# Altium PCB PCB_Z35.PcbDoc (part 2 of 3)
Units mm, origin at the board's own origin, x right, y up, seen from the top; angles counter-clockwise.
Board outline 116.46 x 196.34 mm, 2 copper layers (Top Layer, Bottom Layer), stack 1.671 mm thick; 178 components, 183 nets, 705 pads, 291 vias.
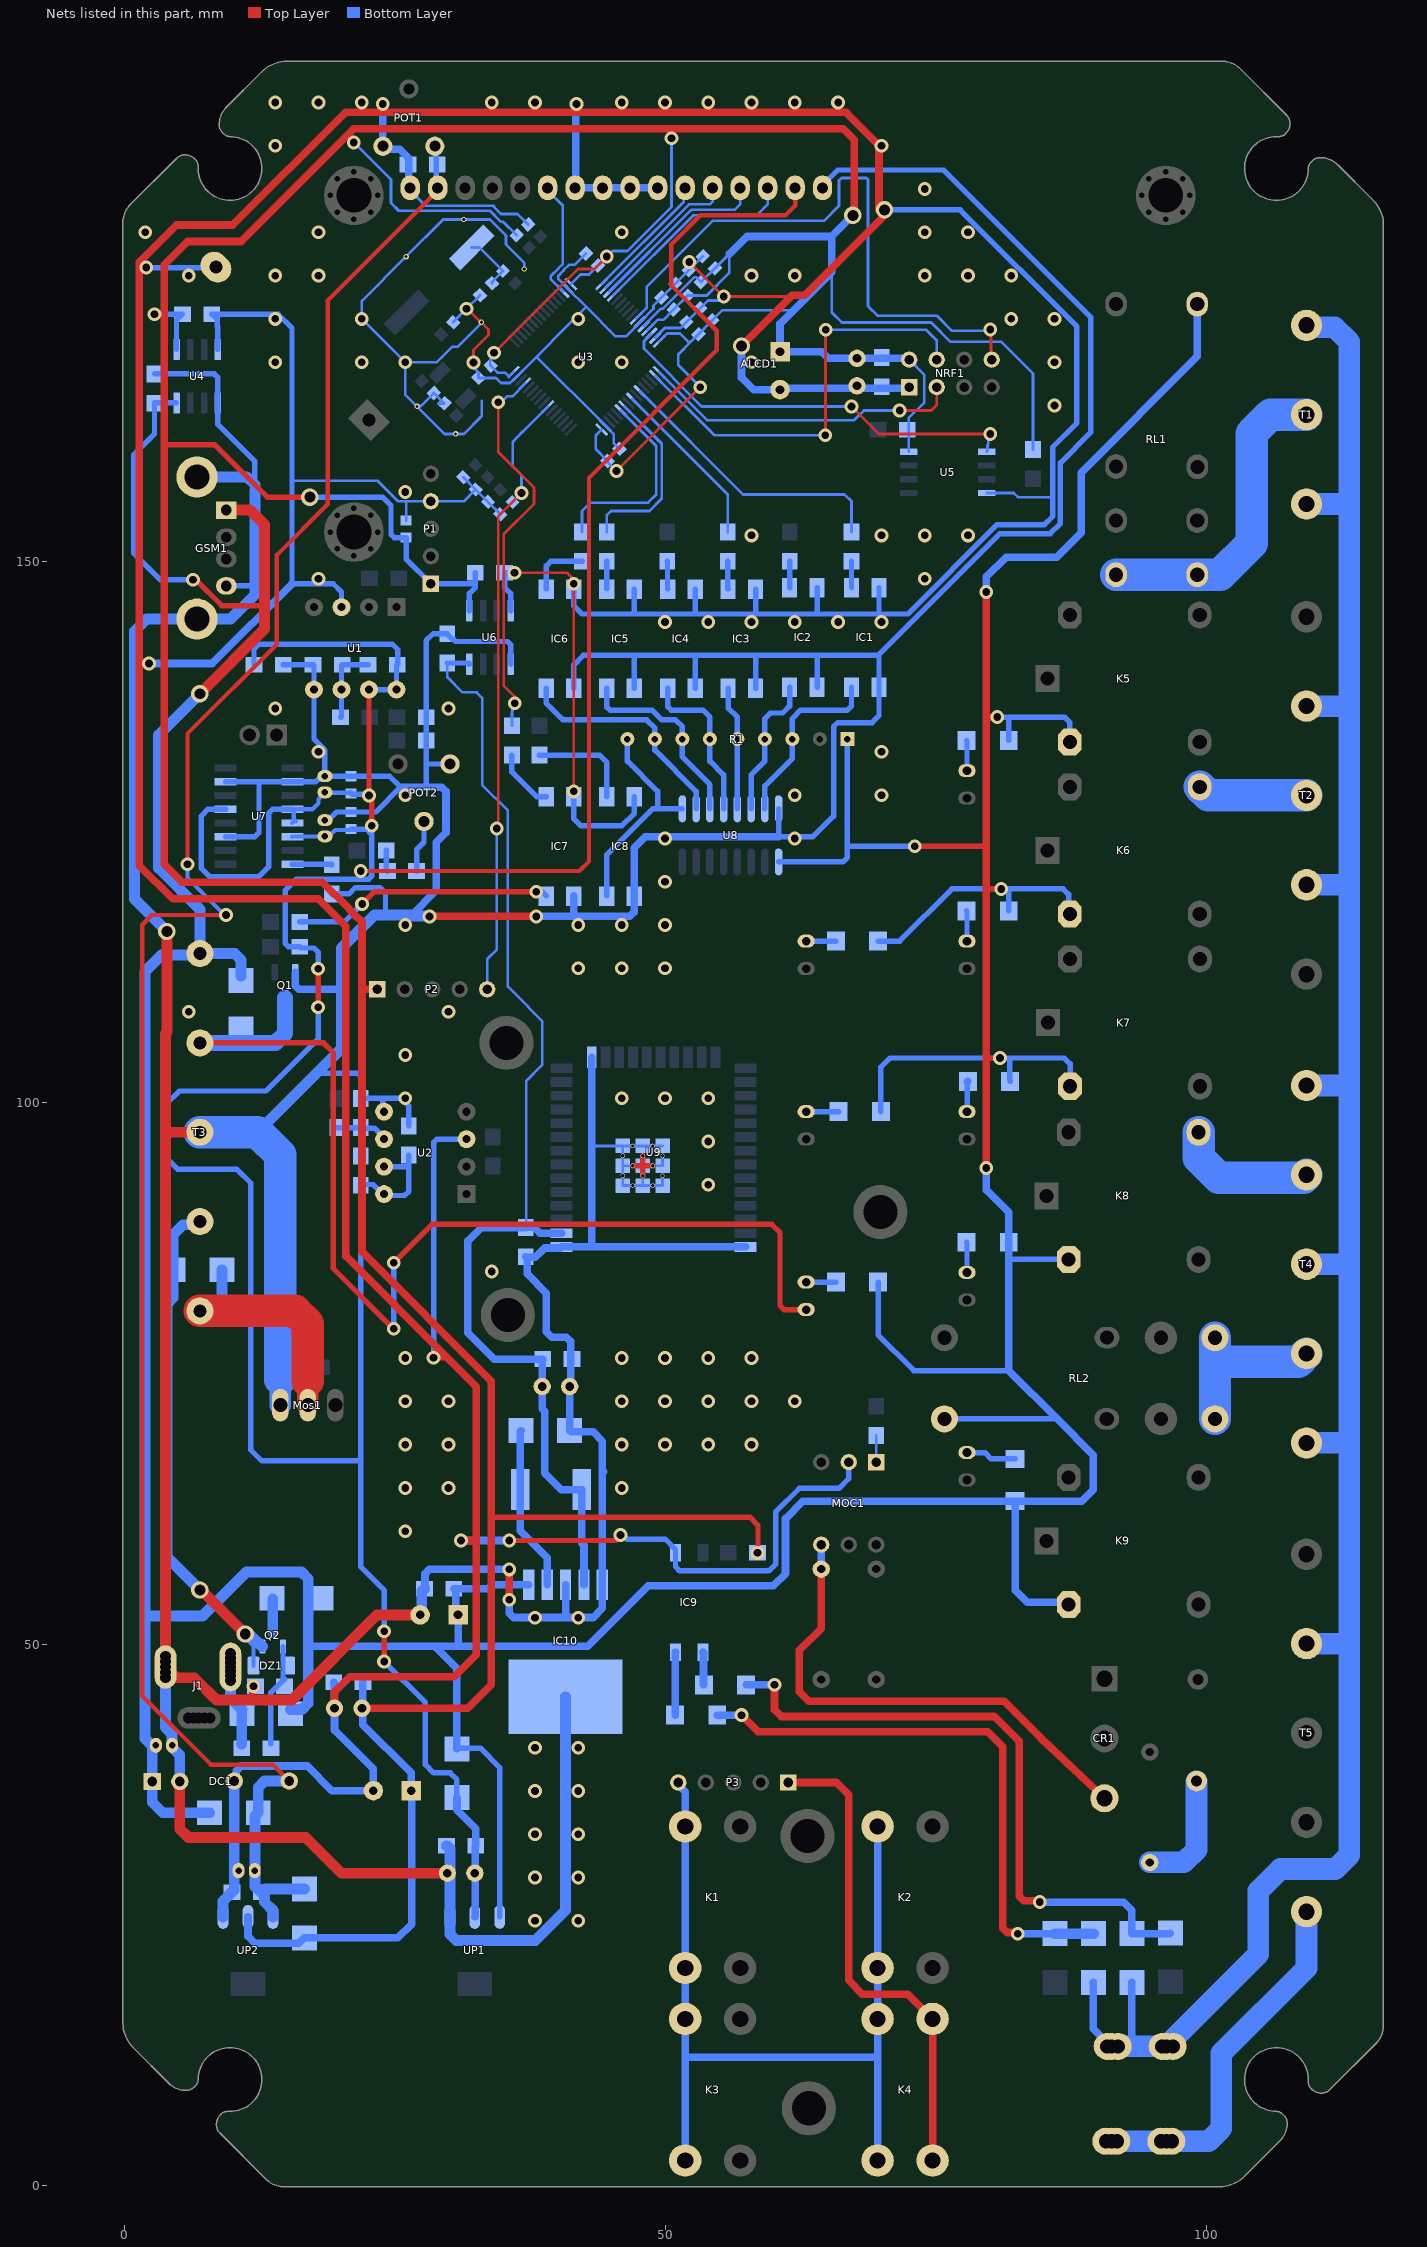
[diagram p2: the nets of this part, all layers, seen from the top]

## Via types
v1: diameter 1.27, hole 0.711, Top Layer to Bottom Layer, tented both sides, 237 vias
v2: diameter 0.5, hole 0.3, Top Layer to Bottom Layer, 40 vias
v3: diameter 1.6, hole 1, Top Layer to Bottom Layer, tented both sides, 8 vias
v4: diameter 0.5, hole 0.3, Top Layer to Bottom Layer, tented both sides, 6 vias

## Nets (pads, with @x,y where several pads share a name; then routed paths per layer and width w, separated by ;. In a path a pad name is that pad's centre, name@x,y a point inside that pad or via, vN(x,y) a via of type N, cw(c..) or ccw(c..) an arc to the next point about the centre after c; other vN are vias at no path point)
3.3v: C1.1 C2.1 C8.1 C10.1 C15.1 C16.1 C17.1 C19.1 C20.1 C21.1 C22.1 C23.1 C25.2 C26.1 C30.1 C31.1 C32.1 C47.1 D16.1 NRF1.2 P1.1 P2.1 R5.2 R7.2 R8.2 R40.1 U3.16 U3.28 U3.29 U3.32 U3.48 U3.64 U4.1 U5.8 U6.1 UP2.2 | length 554.4
  Top Layer w0.254: 20.51,189.293 21.082,188.722 v1(21.209,188.722) ; v1(34.163,169.291) 41.91,177.038 43.452,177.038 44.577,178.163 v1(44.577,178.181) ; v1(45.466,158.369) v1(53.213,166.116) ; v1(50.546,189.103) 50.546,189.992
  Top Layer w0.5: v1(2.794,172.847) 3.683,172.847 ; 3.683,160.782 8.382,160.782 13.208,155.956 v3(17.145,155.956) ; 33.909,61.722 57.785,61.722 58.547,60.96 58.547,58.467 v1(58.5,58.42)
  Top Layer w0.7: C8.1@21.963,44.069 31.75,44.069 33.909,46.228 33.909,61.722 33.909,74.295 21.963,86.241 21.963,110.486 ; P2.1@23.368,110.49 23.364,110.486 21.963,110.486 ; v3(67.31,181.991) 67.437,182.118 67.437,188.976 66.421,189.992 50.546,189.992 21.209,189.992 20.51,189.293 10.795,179.578 5.842,179.578 3.683,177.419 3.683,172.847 3.683,160.782 3.683,122.047 5.334,120.396 18.288,120.396 20.766,117.918 20.766,117.865 21.472,117.159 21.525,117.159 21.963,116.721 21.963,110.486
  Bottom Layer w0.254: v1(21.209,188.722) 24.638,185.293 24.638,183.134 25.356,182.416 33.782,182.416 34.804,181.394 35.014,181.394 R5.2@36.264,180.144 ; v1(34.163,169.291) 33.847,168.975 33.847,168.643 33.819,168.614 33.819,168.129 C26.1@33.847,168.101 34.489,167.459 35.178,167.459 35.537,167.1 35.555,167.1 U3.64@35.965,167.51 ; U3.16@41.268,175.641 42.157,176.53 42.944,176.53 C15.1@43.768,177.354 45.103,178.689 46.482,178.689 50.546,182.753 v1(50.546,189.103) ; U3.48@44.096,162.206 43.561,161.671 43.561,160.383 C30.1@44.639,159.305 44.639,159.196 v1(45.466,158.369) ; U3.28@47.986,171.752 49.6,173.367 49.751,173.367 52.648,176.264 52.859,176.264 C17.1@53.293,175.83 C16.1@54.563,177.1 55.626,178.163 ; U3.29@48.339,171.399 49.279,172.339 49.802,172.339 C20.1@50.753,173.29 C19.1@52.023,174.56 52.051,174.588 53.811,174.588 55.88,176.657 55.88,178.417 ; U3.32@49.4,170.338 50.131,171.069 51.326,171.069 52.11,170.285 52.32,170.285 ; v1(53.213,166.116) 51.181,168.148 51.181,169.146 52.32,170.285 ; 61.849,173.228 55.263,173.228 C21.1@54.309,172.274 C23.1@53.039,171.004 52.32,170.285 ; 65.358,176.737 65.358,173.021 66.294,172.085 74.549,172.085 76.327,170.307 81.026,170.307 83.947,167.386 R8.2@83.947,160.354 ; U5.8@72.468,160.147 72.468,163.273 73.914,164.719 73.914,167.259 NRF1.2@72.517,168.656
  Bottom Layer w0.5: v1(2.794,172.847) C22.1@5.381,172.847 5.331,172.847 4.856,172.372 4.856,172.322 4.826,172.292 U4.1@4.826,169.602 ; v3(17.145,155.956) 23.876,155.956 24.638,155.194 24.638,152.527 24.951,152.214 C31.1@26.045,152.214 26.045,150.231 P1.1@28.321,147.955 32.416,147.955 32.432,147.971 ; U6.1@31.877,145.472 31.877,147.066 32.432,147.621 32.432,147.971 ; C32.1@32.432,148.971 32.432,147.971
  Bottom Layer w0.7: UP2.2@11.43,24.79 11.43,22.987 12.065,22.352 16.129,22.352 D16.1@16.637,22.86 25.273,22.86 26.543,24.13 26.543,36.413 C10.1@26.507,36.449 26.507,38.099 22.043,42.563 C47.1@22.043,46.482 ; 55.88,178.417 55.909,178.417 57.531,180.039 65.358,180.039 ; v3(67.31,181.991) 65.358,180.039 ; NRF1.2@72.517,168.656 72.39,168.783 C2.1@67.691,168.783 65.024,168.783 64.417,169.39 C1.1@60.579,169.39 60.579,171.958 61.849,173.228 65.358,176.737 65.358,180.039
"3.3v / 12v": 
"3.3v Keys": K1.2 K2.2 K3.2 K4.2 P3.5 | length 83.9
  Bottom Layer w0.7: P3.5@51.181,37.211 51.181,36.995 51.816,36.36 K1.2@51.816,33.147 K1.2@51.816,20.066 K3.2@51.816,15.367 51.816,11.811 ; K3.2@51.816,2.286 51.816,11.811 ; K4.2@69.596,2.286 69.596,11.938 ; K2.2@69.596,33.147 K2.2@69.596,20.066 K4.2@69.596,15.367 69.596,11.938 ; 51.816,11.811 69.469,11.811 69.596,11.938
"5v B1205": ALCD1.2 C12.1 C13.1 C49.1 D15.1 D16.2 DC1.7 POT1.2 UP2.3 | length 198.2
  Top Layer w0.4: v1(5.842,122.047) 5.842,134.112 14.097,142.367 14.097,150.622 18.796,155.321 18.796,174.117 28.956,184.277 ALCD1.2@28.956,184.531 ; v1(9.398,117.348) 2.54,117.348 1.651,116.459 1.651,45.212 8.001,38.862 13.716,38.862 DC1.7@15.24,37.338
  Bottom Layer w0.4: v1(5.842,122.047) 5.842,120.777 9.271,117.348 v1(9.398,117.348)
  Bottom Layer w0.5: POT1.2@28.689,188.104 28.822,187.971 28.822,184.665 ALCD1.2@28.956,184.531
  Bottom Layer w1: UP2.3@13.73,24.79 13.73,25.39 12.928,26.192 12.928,26.842 C49.1@12.703,27.067 ; DC1.7@15.24,37.338 12.96,37.338 12.374,36.752 D15.1@12.374,34.417 12.072,34.115 12.072,29.086 C12.1@12.053,29.067 12.072,29.048 12.072,27.598 12.603,27.067 C49.1@12.703,27.067 ; D16.2@16.637,27.36 12.996,27.36 C49.1@12.703,27.067
+5: ALCD1.15 C3.1 C4.1 C11.1 C35.1 C38.1 C39.1 C43.1 C48.1 D14.1 R20.2 R29.2 R34.2 U1.7 U1.8 U2.7 U2.8 U7.4 U7.5 U7.6 U7.13 UP1.2 | length 352.2
  Top Layer w0.4: v1(21.844,121.412) 42.037,121.412 42.926,122.301 42.926,157.734 54.737,169.545 54.737,171.323 50.546,175.514 50.546,179.324 53.213,181.991 61.087,181.991 61.976,182.88 ALCD1.15@61.976,184.531
  Top Layer w0.5: v1(17.907,108.839) v1(17.907,112.395) ; U1.7@22.606,138.176 v1(22.606,128.397) 22.86,128.143 v1(22.86,125.603) ; v1(24.003,48.387) v1(24.003,51.181)
  Bottom Layer w0.4: U7.6@15.519,124.587 15.531,124.599 18.53,124.599 C4.1@18.542,124.611 18.881,124.611 19.481,125.211 20.887,125.211 C39.1@20.965,125.29 ; U7.5@15.519,125.857 15.646,125.984 U7.5@15.862,125.984 ; U7.5@15.653,125.984 15.65,125.987 15.65,126.997 U7.4@15.519,127.127 17.376,127.127 17.935,127.686 17.935,128.047 18.535,128.647 C3.1@18.535,128.686 18.582,128.639 C38.1@20.918,128.639 ; 21.844,120.65 v1(21.844,121.412)
  Bottom Layer w0.5: U7.13@9.373,127.127 7.747,127.127 7.112,126.492 7.112,121.666 7.874,120.904 12.446,120.904 13.335,121.793 13.335,126.746 13.716,127.127 U7.4@15.519,127.127 ; C35.1@11.985,140.462 11.985,141.906 12.446,142.367 24.765,142.367 25.273,141.859 25.273,140.509 25.146,140.382 U1.8@25.146,138.176 U1.7@22.606,138.176 ; v1(17.907,108.839) 17.907,105.918 13.081,101.092 5.08,101.092 3.81,99.822 3.81,94.996 4.953,93.853 10.414,93.853 11.684,92.583 11.684,67.945 12.7,66.929 21.844,66.929 ; v1(17.907,112.395) 17.907,113.919 17.526,114.3 16.336,114.3 R29.2@16.209,114.427 15.152,114.427 14.859,114.72 14.859,119.634 15.875,120.65 21.844,120.65 22.567,120.65 22.86,120.943 22.86,124.802 ; C38.1@20.918,128.639 21.063,128.494 22.509,128.494 v1(22.606,128.397) ; C39.1@20.965,125.29 22.372,125.29 22.86,124.802 ; v1(22.86,125.603) 22.86,124.802 ; v1(24.003,48.387) 27.813,44.577 27.813,38.862 28.575,38.1 30.099,38.1 30.726,37.473 D14.1@30.726,35.814 ; v1(24.003,51.181) 24.003,54.991 21.844,57.15 21.844,66.929 ; U2.7@24.003,94.107 26.276,94.107 26.289,94.12 ; C43.1@26.289,95.17 26.289,94.12 ; 21.844,66.929 R34.2@21.844,92.376 21.924,92.456 22.987,92.456 23.876,91.567 U2.8@24.003,91.567 24.13,91.44 25.908,91.44 26.289,91.821 26.289,94.12
  Bottom Layer w0.7: D14.1@30.726,35.814 30.734,35.806 30.734,34.671 32.465,32.94 C48.1@32.465,31.369 32.425,31.329 32.425,24.83 UP1.2@32.385,24.79
+12v: C6.1 C9.1 C27.1 C46.1 D9.2 D12.2 D13.2 D14.2 D15.2 DC1.1 GSM1.1 IC10.1 K5.4 K6.4 K7.4 K8.4 K9.4 R1.1 R24.1 R26.1 R28.1 R30.1 R32.1 R35.1 R36.2 R39.1 RL1.A1 RL2.A2 T3.5 U4.8 U8.9 UP1.3 | length 594.9
  Top Layer w0.5: v1(6.35,148.336) v1@6.558,148.336 ; v1@6.581,148.359 9.017,145.923 12.954,145.923 ; v1(73.025,123.698) 79.629,123.698 ; 79.629,104.14 v1(80.899,104.14) ; 79.629,119.761 v1(81.026,119.761)
  Top Layer w0.7: v1(79.629,93.98) 79.629,104.14 79.629,119.761 79.629,123.698 79.629,135.636 ; v1(79.629,147.193) 79.629,135.636 ; v1(80.645,135.636) 79.629,135.636
  Top Layer w1: v3(6.985,137.795) 12.954,143.764 12.954,145.923 12.954,153.416 11.613,154.757 GSM1.1@9.427,154.757
  Bottom Layer w0.5: U4.8@4.826,164.662 2.817,164.662 C27.1@2.794,164.639 2.794,161.798 0.889,159.893 0.889,150.749 3.302,148.336 v1(6.35,148.336) ; D14.2@30.726,40.314 30.798,40.386 32.893,40.386 34.685,38.594 UP1.3@34.685,24.79 ; U8.9@60.452,122.264 66.384,122.264 66.802,122.682 66.802,123.698 ; R1.1@66.802,133.604 66.802,123.698 ; R36.2@69.641,83.439 69.641,78.568 72.943,75.266 81.706,75.266 ; R28.1@69.641,114.935 71.628,114.935 76.454,119.761 v1(81.026,119.761) v1@81.407,119.761 ; R32.1@69.895,99.187 69.895,103.296 70.739,104.14 v1(80.899,104.14) 86.829,104.14 87.376,103.593 K7.4@87.376,101.534 ; v1(73.025,123.698) 66.802,123.698 ; RL2.A2@75.765,70.799 86.173,70.799 ; v1(80.645,135.636) 86.868,135.636 87.354,135.15 K5.4@87.354,133.317 ; 81.706,85.598 81.772,85.532 K8.4@87.249,85.532 ; R26.1@81.706,117.729 81.706,119.462 v1@81.407,119.761 ; R24.1@81.706,133.477 81.706,135.509 ; 81.788,104.013 81.788,102.108 81.833,102.063 R30.1@81.833,101.981 ; K6.4@87.354,117.442 87.249,117.547 87.249,119.253 86.741,119.761 v1@81.407,119.761
  Bottom Layer w0.7: 16.992,49.784 28.702,49.784 ; D14.2@30.726,40.314 30.726,47.76 28.702,49.784 ; IC10.1@37.367,55.476 34.013,55.476 33.647,55.11 C46.1@30.433,55.11 30.633,54.91 30.633,52.897 C6.1@30.833,52.697 30.861,52.669 30.861,49.784 ; v1(79.629,93.98) 79.629,91.948 81.706,89.871 R35.1@81.706,87.122 81.706,85.598 81.706,75.266 86.173,70.799 89.535,67.437 89.535,64.262 88.474,63.201 R39.1@82.296,63.201 ; v1(79.629,147.193) 79.629,148.59 81.462,150.423 86.161,150.423 88.392,152.654 88.392,158.225 99.127,168.96 RL1.A1@99.127,173.79 ; K9.4@87.249,53.655 87.056,53.848 83.439,53.848 82.296,54.991 R39.1@82.296,63.201 ; 28.702,49.784 30.861,49.784 ; 30.861,49.784 42.799,49.784 48.387,55.372 59.944,55.372 61.087,56.515 61.087,61.595 62.693,63.201 R39.1@82.296,63.201
  Bottom Layer w1: v3(6.985,137.795) 3.175,133.985 3.175,121.666 6.985,117.856 T3.5@6.985,113.792 ; D15.2@7.874,34.417 3.556,34.417 2.589,35.384 DC1.1@2.589,37.307 2.589,40.591 1.905,41.275 1.905,52.705 ; D9.2@10.795,111.688 10.795,113.206 10.209,113.792 T3.5@6.985,113.792 ; D13.2@15.367,43.942 16.406,43.942 16.992,44.528 16.992,49.784 16.992,56.033 16.383,56.642 11.303,56.642 7.239,52.578 2.032,52.578 1.905,52.705 ; 1.905,52.705 1.905,112.141 3.429,113.665 6.858,113.665 T3.5@6.985,113.792
"+12v Adopter": D13.1 J1.1 R44.2 | length 8
  Bottom Layer w1: J1.1@9.81,48.279 J1.1@9.81,47.079 9.81,44.999 10.867,43.942 10.854,43.93 10.854,40.779 R44.2@10.842,40.767
+12v_Sun_LED: D10.2 DZ1.2 Q2.2 T3.2 | length 47.8
  Top Layer w1: v3(6.985,54.991) 7.112,54.991 v3(11.176,50.927)
  Bottom Layer w0.4: v3@11.674,50.812 11.406,50.544 11.406,50.373 11.939,49.839 DZ1.2@11.939,48.006
  Bottom Layer w1: v3(6.985,54.991) 3.937,58.039 3.937,81.407 4.517,81.987 D10.2@4.517,84.582 4.517,87.829 5.428,88.74 6.698,88.74 T3.2@6.985,89.027 ; v3@11.674,50.812 12.711,49.775 Q2.2@12.766,49.775
ADC1: 
ADC2: 
ADC3: 
ADC4: 
Bat+: 
Bat-: 
Blink: 
"CE - NRF": NRF1.3 U3.33 | length 29.7
  Top Layer w0.254: v1(71.628,163.957) 74.549,163.957 75.057,164.465 NRF1.3@75.057,166.116
  Bottom Layer w0.254: U3.33@49.4,167.51 53.841,163.068 67.437,163.068 68.326,163.957 v1(71.628,163.957)
"Charge En": 
"CO2 IN 1": 
"CO2 IN 2": 
Cooler: R15.2 U3.40 | length 16
  Bottom Layer w0.254: U3.40@46.925,165.035 55.753,156.207 R15.2@55.753,152.734
"Cooler out": K6.3 T2.3 | length 10.2
  Bottom Layer w3: K6.3@99.354,129.192 100.149,128.397 T2.3@109.22,128.397
"CSN - NRF": NRF1.4 U3.34 | length 40.2
  Top Layer w0.254: v1(64.77,161.671) 64.783,161.684 64.783,171.412 v1(64.795,171.425)
  Bottom Layer w0.254: U3.34@49.046,167.156 54.531,161.671 v1(64.77,161.671) ; v1(64.795,171.425) 74.066,171.425 75.057,170.434 NRF1.4@75.057,168.656
"CSN - W25": U3.30 U5.1 | length 38.7
  Top Layer w0.254: v1(67.183,164.338) 69.723,161.798 v1(80.01,161.798)
  Bottom Layer w0.254: U3.30@48.693,171.045 48.006,170.359 48.006,169.672 53.34,164.338 v1(67.183,164.338) ; U5.1@79.678,160.147 79.756,160.225 79.756,160.782 79.816,160.842 79.816,161.604 v1(80.01,161.798)
D4: ALCD1.11 U3.17 | length 12.1
  Bottom Layer w0.254: U3.17@44.096,175.641 51.689,183.234 51.689,184.404 ALCD1.11@51.816,184.531
D5: ALCD1.12 U3.18 | length 14.5
  Bottom Layer w0.254: U3.18@44.45,175.288 52.169,183.007 54.102,183.007 54.356,183.261 ALCD1.12@54.356,184.531
D6: ALCD1.13 U3.19 | length 17
  Bottom Layer w0.254: U3.19@44.804,174.934 52.368,182.499 56.388,182.499 56.896,183.007 ALCD1.13@56.896,184.531
D7: ALCD1.14 U3.20 | length 19.3
  Bottom Layer w0.254: U3.20@45.157,174.581 52.567,181.991 58.42,181.991 59.436,183.007 ALCD1.14@59.436,184.531
"Day lamp": R18.2 U3.43 | length 18.6
  Bottom Layer w0.254: R18.2@42.291,152.734 42.291,154.686 43.053,155.448 48.387,155.448 49.149,156.21 49.149,160.689 U3.43@45.864,163.974
"Day lamp out": RL2.14 RL2.24 T4.2 | length 16.3
  Bottom Layer w3: RL2.24@100.765,70.799 100.765,76.073 ; RL2.14@100.765,78.299 100.765,76.073 ; T4.2@109.22,76.835 108.458,76.073 100.765,76.073
"Down button": P2.5 R12.2 U3.55 | length 58
  Top Layer w0.254: v1(34.417,125.349) 34.544,125.476 34.544,154.178 v1(36.703,156.337)
  Bottom Layer w0.254: P2.5@33.528,110.49 33.528,113.284 34.417,114.173 v1(34.417,125.349) ; R12.2@35.872,155.506 v1(36.703,156.337) 36.703,157.988 35.897,158.794 35.897,161.078 36.239,161.42 36.239,161.439 36.808,162.008 36.827,162.008 U3.55@39.147,164.328
"Down button K": K4.1 P3.1 | length 45.5
  Top Layer w0.7: P3.1@61.341,37.211 65.786,37.211 66.929,36.068 66.929,18.923 68.199,17.653 72.39,17.653 K4.1@74.676,15.367 K4.1@74.676,2.286
E: ALCD1.6 U3.14 | length 11.1
  Bottom Layer w0.254: ALCD1.6@39.116,184.531 39.116,184.277 40.513,182.88 40.513,177.504 40.127,177.118 40.127,177.096 39.391,176.361 39.391,176.104 U3.14@40.561,174.934
"ESP 3.3v": C5.1 C33.1 C44.1 C45.1 IC10.4 L1.2 U6.8 U9.2 | length 108.6
  Bottom Layer w0.254: C33.1@29.845,140.636 29.845,139.319 31.242,137.922 32.556,137.922 33.064,137.414 33.064,129.369 35.433,127 35.433,110.744 37.338,108.839 37.338,108.818 38.608,107.548 38.608,103.505 37.131,102.028 C44.1@37.131,88.519
  Bottom Layer w0.5: C33.1@29.845,140.636 31.827,140.636 31.877,140.586 U6.8@31.877,140.532
  Bottom Layer w0.7: C44.1@37.084,88.472 32.973,88.472 31.733,87.232 31.733,78.757 34.163,76.327 C45.1@38.655,76.327 38.632,76.303 38.632,73.811 C5.1@38.608,73.787 38.608,71.755 38.862,71.501 38.862,65.786 40.386,64.262 L1.2@42.276,64.262 42.276,59.324 42.467,59.133 IC10.4@42.467,55.476 ; C44.1@37.131,88.519 37.846,88.519 38.407,87.958 U9.2@40.395,87.958
fuse: j3.1 pad.6 pad.7 pad.8 pad.9 T5.1 | length 33.9
  Bottom Layer w2: j3.1@91.186,4.064 j3.1@96.266,4.064 100.174,4.064 101.346,5.236 101.346,12.192 109.22,20.066 T5.1@109.22,25.273
"Gas heater": R23.2 U3.61 | length 36.1
  Top Layer w0.254: v1(34.544,164.719) 34.544,160.147 37.846,156.845 37.846,155.321 35.052,152.527 35.052,138.557 36.068,137.541 v1(36.068,136.906)
  Bottom Layer w0.254: v1(34.544,164.719) 34.819,164.719 35.371,165.271 35.847,165.271 U3.61@37.025,166.449 ; R23.2@35.814,134.827 35.814,136.144 35.874,136.204 35.874,136.712 v1(36.068,136.906)
"Gas heater out": D7.2 D9.1 Q1.3 T3.4 | length 104.9
  Top Layer w0.5: T3.4@6.985,105.537 18.415,105.537 19.304,104.648 19.304,84.709 v1(24.892,79.121) ; v1(24.892,85.217) 28.448,88.773 59.817,88.773 60.579,88.011 60.579,81.28 60.96,80.899 D7.2@62.992,80.899
  Bottom Layer w0.5: v1(24.892,79.121) v1(24.892,85.217)
  Bottom Layer w1.5: T3.4@6.985,105.537 13.97,105.537 14.859,106.426 Q1.3@14.859,109.681
GND: 
GND-3.3v: ALCD1.1 ALCD1.7 ALCD1.8 ALCD1.9 ALCD1.10 BT1.2 C1.2 C2.2 C8.2 C10.2 C12.2 C13.2 C14.2 C15.2 C16.2 C17.2 C18.2 C19.2 C20.2 C21.2 C22.2 C23.2 C24.2 C25.1 C26.2 C28.2 C29.2 C30.2 C31.2 C32.2 C47.2 C49.2 DC1.5 IC1.2 IC2.2 IC3.2 IC4.2 IC5.2 IC6.2 IC7.2 IC8.2 IC9.3 MOC1.2 NRF1.1 P1.4 POT1.1 R9.1 R10.1 R11.1 R12.1 U1.3 U2.3 U3.15 U3.27 U3.31 U3.47 U3.63 U4.4 U5.4 U6.4 UP2.1 | length 807
  Top Layer w0.254: v1@31.623,173.221 v1(31.623,173.37) 31.679,173.37 32.939,172.11 v4(32.995,172.11) 33.655,171.45 33.655,170.942 32.258,169.545 v1(32.258,168.402) ; v1(36.055,148.971) 40.894,148.971 41.529,148.336 v1(41.529,147.95) v1(41.529,128.773) ; v1(52.197,177.673) v1(55.372,174.498) 61.595,174.498 61.722,174.625
  Top Layer w0.5: v1@1.397,177.165 v1(2.032,177.165) ; v1(28.575,76.454) 29.845,76.454 ; v1(35.56,59.563) 45.427,59.563 45.847,59.983 v1(45.847,60.071)
  Top Layer w0.7: v1(2.286,140.589) 2.177,140.698 1.415,140.698 1.397,140.716 ; C8.2@19.423,44.069 19.423,45.593 20.82,46.99 30.48,46.99 32.512,49.022 32.512,59.563 ; v1(23.876,192.278) 23.876,191.516 ; v1(31.115,59.563) 32.512,59.563 ; v1(41.783,192.278) 41.783,191.516 ; v3@57.15,170.053 61.595,174.498 ; 61.722,174.625 62.865,174.625 70.059,181.819 70.059,182.327 v3(70.231,182.499) ; v3@69.723,182.481 69.723,188.468 66.675,191.516 41.783,191.516 ; 1.397,140.716 1.397,177.165 1.397,177.673 4.826,181.102 10.033,181.102 20.447,191.516 23.876,191.516 ; 1.397,140.716 1.397,121.92 4.47,118.847 17.932,118.847 20.447,116.332 20.447,85.852 29.845,76.454 32.512,73.787 32.512,59.563 ; 23.876,191.516 41.783,191.516
  Bottom Layer w0.254: 15.494,157.48 23.368,157.48 25.273,155.575 26.045,155.575 ; C31.2@26.045,153.794 26.045,155.575 ; ALCD1.1@26.416,184.531 26.416,184.277 27.813,182.88 34.141,182.88 34.163,182.858 34.163,182.753 34.798,182.118 36.337,182.118 C14.2@37.317,181.138 ; C29.2@29.028,164.628 29.056,164.6 29.541,164.6 C29.2@29.57,164.628 29.54,164.628 C28.2@28.596,165.572 27.409,164.385 27.098,164.385 v4(27.051,164.338) ; C24.2@30.389,172.106 30.389,172.136 v1(31.623,173.37) C18.2@32.857,174.604 ; R9.1@31.311,157.803 R10.1@32.454,156.66 ; v1(32.258,168.402) 32.258,168.148 32.385,168.021 32.385,167.814 32.73,167.469 C26.2@32.73,166.984 32.758,166.955 34.34,166.955 34.798,166.497 35.641,166.497 36.301,167.156 U3.63@36.318,167.156 42.668,173.506 42.696,173.506 ; v4(32.995,172.11) 32.995,172.06 30.778,169.843 30.294,169.843 28.875,168.424 v1(25.947,168.424) ; 33.02,164.846 33.02,163.449 31.369,161.798 v4(30.607,161.798) 29.591,161.798 v4(27.051,164.338) ; R12.1@34.74,154.374 R11.1@33.597,155.517 R10.1@32.454,156.66 ; v4(36.957,177.038) 36.957,177.587 35.256,179.288 35.256,180.136 33.782,181.61 v4(31.369,181.61) 29.464,181.61 v4(26.035,178.181) 21.947,174.093 v1(21.947,172.424) v1(25.947,168.424) ; 38.1,168.91 U3.47@44.45,162.56 45.212,161.798 45.212,160.966 C30.2@45.756,160.422 ; C15.2@42.651,178.471 41.599,177.419 41.085,177.419 40.591,176.925 40.591,176.904 40.1,176.414 40.1,176.102 U3.15@40.914,175.288 42.696,173.506 ; U3.31@49.046,170.692 49.931,171.577 51.378,171.577 C23.2@51.922,172.121 C21.2@53.192,173.391 53.918,174.117 55.626,174.117 55.372,174.371 v1(55.372,174.498) ; C16.2@53.446,178.217 C17.2@52.176,176.947 C19.2@50.906,175.677 C20.2@49.636,174.407 48.895,173.666 48.895,173.369 U3.27@47.632,172.106 46.341,170.815 45.387,170.815 42.696,173.506 ; U5.4@79.678,156.337 82.169,156.337 82.55,155.956 85.777,155.956 ; v1(25.947,168.424) 25.947,165.442 v4(27.051,164.338) ; 26.045,155.575 P1.4@28.321,155.575 31.369,155.575 R10.1@32.454,156.66
  Bottom Layer w0.5: v1(2.032,177.165) 8.419,177.165 BT1.2@8.464,177.21 ; C22.2@8.081,172.847 C22.2@8.131,172.847 ; U4.4@8.636,169.602 8.636,171.704 8.606,171.734 8.606,172.372 C22.2@8.131,172.847 ; 15.494,147.955 15.494,157.48 15.494,171.577 14.224,172.847 C22.2@8.131,172.847 ; 15.621,147.955 19.304,147.955 20.066,147.193 U1.3@20.066,145.796 ; v1(28.575,76.454) 28.575,96.354 28.868,96.647 U2.3@31.623,96.647 ; U6.4@35.687,145.472 35.687,147.066 35.132,147.621 C32.2@35.132,148.971 v1(36.055,148.971) ; IC7.2@41.529,128.291 41.529,126.238 42.164,125.603 45.974,125.603 47.117,126.746 IC8.2@47.117,128.291 ; IC6.2@41.529,147.468 41.529,145.923 42.291,145.161 47.117,145.161 ; v1(45.847,60.071) 46.055,60.071 46.436,59.69 49.978,59.69 50.927,58.741 IC9.3@50.927,58.441 50.927,57.15 51.308,56.769 59.563,56.769 60.198,57.404 60.198,62.23 62.357,64.389 66.04,64.389 66.929,65.278 MOC1.2@66.929,66.802 ; IC5.2@47.117,147.468 47.117,147.193 47.117,145.161 ; IC4.2@52.746,147.468 52.746,145.329 52.578,145.161 ; IC3.2@58.326,147.468 58.326,145.194 58.293,145.161 ; IC2.2@64.008,147.595 64.008,145.161 ; IC1.2@69.723,147.595 69.723,145.288 69.596,145.161 ; v3(70.231,182.499) 77.216,182.499 88.011,171.704 88.011,162.814 85.777,160.58 85.777,155.956 85.777,154.176 85.017,153.416 80.645,153.416 72.39,145.161 69.596,145.161 ; 47.117,145.161 52.578,145.161 ; 52.578,145.161 58.293,145.161 ; 58.293,145.161 64.008,145.161 ; 64.008,145.161 69.596,145.161
  Bottom Layer w0.7: v1(2.286,140.589) 8.128,140.589 15.494,147.955 ; DC1.5@10.16,37.338 10.332,37.51 10.332,38.268 10.799,38.735 16.891,38.735 19.177,36.449 C10.2@23.007,36.449 23.007,38.461 19.423,42.045 C8.2@19.423,44.069 19.383,44.109 19.383,46.442 C47.2@19.343,46.482 ; v1(23.876,192.278) 23.889,192.265 23.889,188.104 25.439,188.104 26.289,187.254 26.289,184.658 ALCD1.1@26.416,184.531 ; v1(31.115,59.563) v1(35.56,59.563) ; v1(41.783,192.278) 41.719,192.214 41.719,184.594 ALCD1.7@41.656,184.531 ALCD1.8@44.196,184.531 ALCD1.9@46.736,184.531 ALCD1.10@49.276,184.531 ; v3(57.023,169.926) 57.023,167.005 58.138,165.89 C1.2@60.579,165.89 60.692,166.003 72.404,166.003 NRF1.1@72.517,166.116
  Bottom Layer w1: UP2.1@9.13,24.79 9.13,26.244 9.678,26.792 9.678,26.842 9.903,27.067 C49.2@9.953,27.067 10.16,27.274 10.16,29.637 ; DC1.5@10.16,37.338 10.16,29.637 ; C12.2@10.553,29.067 10.553,29.244 10.16,29.637
  other v1: 49.947,144.424 53.947,144.424 57.947,144.424 61.947,144.424 65.947,144.424 69.947,144.424 17.947,148.424 73.947,148.424 57.947,152.424 69.947,152.424 73.947,152.424 77.947,152.424 25.947,156.424 85.947,164.424 13.947,168.424 21.947,168.424 41.947,168.424 45.947,168.424 57.947,168.424 85.947,168.424 13.947,172.424 41.947,172.424 81.947,172.424 85.947,172.424 5.947,176.424 13.947,176.424 17.947,176.424 57.947,176.424 61.947,176.424 73.947,176.424 77.947,176.424 81.947,176.424 1.947,180.424 17.947,180.424 45.947,180.424 73.947,180.424 77.947,180.424 73.947,184.424 13.947,188.424 69.947,188.424 13.947,192.424 17.947,192.424 21.947,192.424 33.947,192.424 37.947,192.424 45.947,192.424 49.947,192.424 53.947,192.424 57.947,192.424 61.947,192.424 65.947,192.424
GND-12v: ALCD1.16 C3.2 C4.2 C5.2 C6.2 C9.2 C11.2 C27.2 C33.2 C34.2 C35.2 C36.2 C37.2 C38.2 C39.2 C40.2 C42.2 C43.2 C44.2 C45.2 C46.2 C48.2 D11.1 DC1.2 GSM1.4 IC1.3 IC2.3 IC3.3 IC4.3 IC5.3 IC6.3 IC7.3 IC8.3 IC10.3 IC10.5 IC10.6 J1.2 Mos1.3 POT2.1 Q1.2 R37.1 R42.2 T3.3 U1.5 U2.5 U4.5 U6.5 U7.2 U7.11 U7.15 U8.8 U9.1 U9.15 U9.38 U9.39_1 U9.39_2 U9.39_3 U9.39_4 U9.39_5 U9.39_6 U9.39_7 U9.39_8 U9.39_9 U9.39_10 U9.39_11 U9.39_12 U9.39_13 U9.39_14 U9.39_15 U9.39_16 U9.39_17 U9.39_18 U9.39_19 U9.39_20 U9.39_21 UP1.1 | length 752.3
  Top Layer w0.5: 11.43,44.831 11.791,45.192 11.791,45.954 v1(11.938,46.101) ; U9.39_15@46.978,94.188 U9.39_16@48.813,94.188 ; U9.39_13@47.895,93.27 U9.39_18@47.895,95.105
  Top Layer w0.7: v1(28.194,117.221) v1(38.056,117.221) ; v1(35.56,54.102) v1(35.56,56.896)
  Top Layer w1: J1.2@3.81,47.379 J1.2@3.81,47.879 ; v3(3.937,115.824) 3.937,106.535 3.81,106.408 3.81,97.282 ; DC1.2@5.129,37.307 5.129,32.922 5.92,32.131 16.764,32.131 20.066,28.829 C11.2@29.845,28.829 ; T3.3@6.985,97.282 3.81,97.282 ; Mos1.3@14.352,72.136 Mos1.3@14.415,72.072 ; C6.2@27.333,52.697 23.36,52.697 15.494,44.831 11.43,44.831 8.509,44.831 6.461,46.879 4.81,46.879 J1.2@3.81,47.879 ; J1.2@3.81,47.879 J1.2@3.81,48.379 J1.2@3.81,48.879 3.81,97.282
  Bottom Layer w0.254: 43.18,96.012 43.191,96.023 U9.39_7@46.06,96.023 ; U9.39_13@47.895,93.27 U9.39_2@47.895,92.353 ; U9.39_18@47.895,95.105 U9.39_5@47.895,94.188 ; U9.39_14@49.73,93.27 U9.39_3@49.73,92.353 U9.39_11@48.813,92.353 U9.39_2@47.895,92.353 ; U9.39_19@49.73,95.105 U9.39_6@49.73,94.188 U9.39_16@48.813,94.188 U9.39_5@47.895,94.188 ; U9.39_9@49.73,96.023 U9.39_21@48.813,96.023 U9.39_8@47.895,96.023 U9.39_20@46.978,96.023 U9.39_7@46.06,96.023 ; U9.39_4@46.06,94.188 U9.39_15@46.978,94.188 U9.39_5@47.895,94.188 ; U9.39_4@46.06,94.188 U9.39_17@46.06,95.105 U9.39_7@46.06,96.023 ; U9.39_4@46.06,94.188 U9.39_12@46.06,93.27 U9.39_1@46.06,92.353 U9.39_10@46.978,92.353 U9.39_2@47.895,92.353
  Bottom Layer w0.5: C27.2@2.794,167.339 8.302,167.339 8.636,167.005 U4.5@8.636,164.662 8.636,162.687 12.065,159.258 12.065,157.099 12.065,156.591 ; U7.11@9.373,124.587 12.065,124.587 12.446,124.968 12.446,129.667 ; U7.15@9.373,129.667 12.446,129.667 ; GSM1.4@9.427,147.757 12.009,147.757 12.065,147.701 ; C35.2@14.685,140.462 C34.2@17.446,140.462 17.526,140.382 U1.5@17.526,138.176 17.526,133.604 18.535,132.595 C3.2@18.535,130.186 ; 17.78,102.743 21.551,102.743 21.844,102.45 C42.2@21.844,100.41 23.876,100.41 ; C4.2@18.542,126.111 18.854,126.111 19.613,126.87 C39.2@20.965,126.87 23.238,126.87 25.527,129.159 24.514,130.172 C38.2@20.965,130.172 20.958,130.179 18.542,130.179 C3.2@18.535,130.186 ; C40.2@19.177,119.3 20.748,119.3 21.336,119.888 23.622,119.888 24.13,119.38 24.13,117.348 ; U2.5@24.003,99.187 23.876,99.314 23.876,100.41 ; C43.2@26.289,97.87 26.289,99.695 25.574,100.41 23.876,100.41 ; 28.067,129.159 27.893,129.333 27.893,131.405 ; POT2.1@30.086,131.301 27.997,131.301 27.893,131.405 ; U6.5@35.687,140.532 35.687,142.328 35.394,142.621 30.613,142.621 30.423,142.811 30.32,142.811 29.845,143.286 C33.2@29.845,143.336 28.528,143.336 27.893,142.701 C36.2@27.893,135.636 C37.2@27.893,133.477 27.893,131.405 ; IC6.3@41.529,138.282 41.529,140.462 42.418,141.351 46.99,141.351 ; IC5.3@47.117,138.282 47.117,141.224 46.99,141.351 ; IC4.3@52.746,138.282 52.746,141.183 52.578,141.351 ; IC3.3@58.326,138.282 58.326,141.257 58.42,141.351 ; U8.8@60.452,127.164 60.452,124.587 63.627,124.587 65.532,126.492 65.532,134.747 65.913,135.128 69.088,135.128 69.723,135.763 IC1.3@69.723,138.409 69.723,141.351 ; IC2.3@64.008,138.409 64.008,141.351 ; ALCD1.16@64.516,184.531 64.516,184.785 65.913,186.182 75.692,186.182 89.281,172.593 89.281,161.925 86.487,159.131 86.487,153.531 85.54,152.585 80.882,152.585 69.723,141.426 69.723,141.351 ; 12.446,129.667 U7.2@15.519,129.667 17.704,129.667 18.223,130.186 C3.2@18.535,130.186 ; 46.99,141.351 52.578,141.351 ; 52.578,141.351 58.42,141.351 ; 58.42,141.351 64.008,141.351 ; 64.008,141.351 69.723,141.351
  Bottom Layer w0.7: Q1.2@15.809,112.061 15.809,110.81 16.129,110.49 20.066,110.49 ; 25.527,129.159 28.067,129.159 29.337,129.159 29.718,128.778 29.718,124.968 28.829,124.079 28.829,119.634 26.543,117.348 ; C46.2@27.733,55.11 27.783,55.16 27.783,56.486 28.193,56.896 v1(35.56,56.896) ; v1(35.56,54.102) 35.56,52.861 35.97,52.451 40.64,52.451 ; C44.2@37.084,85.772 C44.2@37.131,85.725 ; v1(38.056,117.221) 41.783,117.221 ; IC10.3@40.767,55.476 40.767,52.578 40.64,52.451 ; IC7.3@41.529,119.105 41.529,117.475 41.783,117.221 ; U9.15@43.18,104.198 43.18,96.012 43.18,86.688 ; 44.294,65.913 44.167,66.04 ; U9.38@57.395,86.688 43.18,86.688 ; 60.452,124.587 48.133,124.587 47.117,123.571 IC8.3@47.117,119.105 47.117,117.631 46.707,117.221 41.783,117.221 ; C44.2@37.131,85.725 37.211,85.645 37.211,84.201 38.989,82.423 38.989,78.867 39.497,78.359 40.841,78.359 41.251,77.949 41.251,73.89 C5.2@41.148,73.787 D11.1@41.148,69.723 41.275,69.596 43.307,69.596 44.167,68.736 44.167,66.04 ; C44.2@37.131,85.725 37.973,85.725 38.836,86.588 40.295,86.588 U9.1@40.395,86.688 43.18,86.688 ; 40.64,52.451 43.307,52.451 44.167,53.311 IC10.5@44.167,55.476 44.167,66.04
  Bottom Layer w1: J1.2@3.81,46.879 3.81,42.291 4.402,41.699 4.402,40.659 C9.2@4.421,40.64 4.421,40.463 5.129,39.755 DC1.2@5.129,37.307 ; v3(3.937,115.824) 0.941,118.82 0.941,143.562 2.066,144.687 GSM1.4@6.717,144.687 9.813,144.687 12.065,146.939 12.065,147.701 12.065,156.591 ; GSM1.4@6.717,157.827 11.337,157.827 12.065,157.099 ; v1(11.938,46.101) R42.2@12.112,46.101 ; 12.319,97.282 17.78,102.743 20.066,105.029 20.066,110.49 20.066,114.3 23.114,117.348 24.13,117.348 26.543,117.348 26.618,117.273 28.142,117.273 v1(28.194,117.221) ; 14.415,74.438 15.267,75.29 15.267,75.34 15.492,75.565 R37.1@15.542,75.565 ; C6.2@27.333,52.697 27.486,52.85 27.486,54.885 27.711,55.11 C46.2@27.733,55.11 ; C48.2@29.765,31.369 29.815,31.369 30.085,31.099 UP1.1@30.085,24.79 30.085,23.192 30.671,22.606 37.973,22.606 40.767,25.4 IC10.6@40.767,45.126
  Bottom Layer w2: Mos1.3@14.415,72.072 14.415,74.438
  Bottom Layer w3: T3.3@6.985,97.282 12.319,97.282 14.415,95.186 14.415,74.438
  other v1: 37.947,24.424 41.947,24.424 37.947,28.424 41.947,28.424 37.947,32.424 41.947,32.424 37.947,36.424 41.947,36.424 37.947,40.424 41.947,40.424 37.947,52.424 41.947,52.424 25.947,60.424 25.947,64.424 29.947,64.424 45.947,64.424 25.947,68.424 29.947,68.424 45.947,68.424 49.947,68.424 53.947,68.424 57.947,68.424 25.947,72.424 29.947,72.424 45.947,72.424 49.947,72.424 53.947,72.424 57.947,72.424 61.947,72.424 25.947,76.424 45.947,76.424 49.947,76.424 53.947,76.424 57.947,76.424 33.947,84.424 53.947,92.424 53.947,96.424 25.947,100.424 45.947,100.424 49.947,100.424 53.947,100.424 25.947,104.424 5.947,108.424 29.947,108.424 41.947,112.424 45.947,112.424 49.947,112.424 25.947,116.424 41.947,116.424 45.947,116.424 49.947,116.424 49.947,120.424 49.947,124.424 61.947,124.424 25.947,128.424 61.947,128.424 69.947,128.424 17.947,132.424 69.947,132.424 13.947,136.424 29.947,136.424
GND_Sun_LED: D10.1 Mos1.2 T3.1 | length 23.5
  Top Layer w2: Mos1.2@16.955,72.072 16.955,74.295
  Top Layer w3: T3.1@6.985,80.772 15.784,80.772 16.955,79.6 16.955,74.295
  Bottom Layer w1: T3.1@6.985,80.772 7.112,80.899 8.509,80.899 9.017,81.407 D10.1@9.017,84.582
Heater: R17.2 U3.42 | length 17.2
  Bottom Layer w0.254: R17.2@44.577,152.734 44.577,154.305 44.958,154.686 48.514,154.686 49.657,155.829 49.657,160.889 U3.42@46.218,164.328
"Heater out": K8.3 T4.4 | length 13.2
  Bottom Layer w3: K8.3@99.249,97.282 99.249,94.934 101.092,93.091 108.966,93.091 T4.4@109.22,93.345
Humidity: R13.2 U3.38 | length 26.6
  Bottom Layer w0.254: U3.38@47.632,165.742 57.164,156.21 66.548,156.21 67.183,155.575 R13.2@67.183,152.734
"Humidity out": RL1.14 RL1.24 T1.2 | length 29.7
  Bottom Layer w3: RL1.24@91.627,148.79 101.241,148.79 104.14,151.689 104.14,161.819 105.897,163.576 T1.2@109.22,163.576
input1: IC8.4 R1.9 U8.1 | length 20.2
  Bottom Layer w0.5: IC8.4@44.577,119.105 44.577,122.936 48.805,127.164 49.276,127.164 ; R1.9@46.482,133.604 46.482,131.572 49.276,128.778 49.276,127.164 ; U8.1@51.562,127.164 49.276,127.164
input2: IC6.4 R1.8 U8.2 | length 21.4
  Bottom Layer w0.5: IC6.4@38.989,138.282 38.989,136.906 40.513,135.382 48.26,135.382 49.022,134.62 R1.8@49.022,133.604 49.022,132.588 52.832,128.778 U8.2@52.832,127.164
input3: IC5.4 R1.7 U8.3 | length 18.1
  Bottom Layer w0.5: IC5.4@44.577,138.282 44.577,136.564 44.87,136.271 48.768,136.271 49.657,135.382 50.927,135.382 51.562,134.747 R1.7@51.562,133.604 51.562,131.953 54.102,129.413 U8.3@54.102,127.164
input4: IC4.4 R1.6 U8.4 | length 15
  Bottom Layer w0.5: IC4.4@50.206,138.282 50.206,136.611 50.546,136.271 53.467,136.271 54.102,135.636 R1.6@54.102,133.604 54.102,131.572 55.372,130.302 U8.4@55.372,127.164
input5: IC3.4 R1.5 U8.5 | length 11.5
  Bottom Layer w0.5: IC3.4@55.786,138.282 55.786,136.492 56.642,135.636 R1.5@56.642,133.604 U8.5@56.642,127.164
input6: IC2.4 R1.4 U8.6 | length 13.4
  Bottom Layer w0.5: U8.6@57.912,127.164 57.912,130.302 59.182,131.572 R1.4@59.182,133.604 59.182,135.509 59.69,136.017 60.833,136.017 61.468,136.652 IC2.4@61.468,138.409
input7: IC1.4 R1.3 U8.7 | length 17.1
  Bottom Layer w0.5: U8.7@59.182,127.164 59.182,129.286 61.722,131.826 R1.3@61.722,133.604 61.722,135.509 62.484,136.271 66.802,136.271 67.183,136.652 IC1.4@67.183,138.409
"IRQ - NRF": NRF1.8 U3.26 | length 56.2
  Top Layer w0.254: v1(80.01,171.45) 80.073,171.386 80.073,168.719 NRF1.8@80.137,168.656
  Bottom Layer w0.254: U3.26@47.278,172.459 48.26,173.441 48.26,175.387 54.356,181.483 64.643,181.483 66.04,182.88 66.04,185.225 66.257,185.442 68.555,185.442 68.58,185.42 68.707,185.293 68.707,173.609 68.781,173.535 69.596,172.72 75.057,172.72 76.454,171.323 79.883,171.323 v1(80.01,171.45)
N220: D18.1 D19.2 j2.1 pad.2 pad.3 pad.4 pad.5 T1.1 T1.3 T2.2 T2.4 T4.1 T4.3 T4.5 T5.4 | length 217.5
  Bottom Layer w0.7: D19.2@89.535,18.741 89.535,14.478 j2.1@91.186,12.827 ; 93.091,12.827 D18.1@93.091,18.741
  Bottom Layer w2: j2.1@91.186,12.827 93.091,12.827 j2.1@96.266,12.827 104.775,21.336 104.775,27.178 106.807,29.21 111.887,29.21 113.157,30.48 113.157,49.911 ; T5.4@109.22,50.038 113.03,50.038 cw(c113.03,49.911) 113.157,49.911 ; T4.1@109.22,68.58 113.157,68.58 ; T4.3@109.22,85.09 112.903,85.09 cw(c112.903,84.836) 113.157,84.836 ; T4.5@109.22,101.6 113.03,101.6 ccw(c113.03,101.727) 113.157,101.727 ; T2.2@109.22,120.142 113.132,120.142 cw(c113.132,120.117) 113.157,120.117 ; T2.4@109.22,136.652 113.132,136.652 cw(c113.132,136.627) 113.157,136.627 ; T1.1@109.22,155.321 113.157,155.321 ; T1.3@109.22,171.831 109.392,171.659 111.805,171.659 113.157,170.307 113.157,155.321 ; 113.157,49.911 113.157,68.58 ; 113.157,68.58 113.157,84.836 ; 113.157,84.836 113.157,101.727 ; 113.157,101.727 113.157,120.117 ; 113.157,120.117 113.157,136.627 ; 113.157,136.627 113.157,155.321
NetC7_1: C7.1 R4.1 | length 11.1
  Bottom Layer w2: R4.1@94.742,29.825 97.888,29.825 99.06,30.997 C7.1@99.06,37.338
NetC18_1: C18.1 R6.1 Y1.2 | length 5.4
  Bottom Layer w0.254: Y1.2@32.088,179.027 32.809,179.027 R6.1@34.994,176.842 33.974,175.822 C18.1@33.974,175.721
NetC34_1: C34.1 R20.1 R21.2 U1.6 | length 7.3
  Bottom Layer w0.5: R21.2@19.986,135.636 20.066,135.716 U1.6@20.066,138.176 20.066,140.382 C34.1@20.146,140.462
  Bottom Layer w0.52: C34.1@20.146,140.462 R20.1@22.526,140.462
NetC40_1: C40.1 U7.8 | length 3.7
  Bottom Layer w0.5: U7.8@15.519,122.047 19.13,122.047 C40.1@19.177,122
NetC41_1: C41.1 R25.1 | length 1.9
  Bottom Layer w0.5: R25.1@24.21,123.317 24.21,121.506 C41.1@24.304,121.412
NetC41_2: C41.2 POT2.3 | length 5.3
  Bottom Layer w0.5: C41.2@27.004,121.412 27.004,123.397 27.281,123.674 ; 27.559,123.952 27.281,123.674 ; POT2.3@27.686,126.001 27.686,124.079 27.281,123.674
NetC42_1: C42.1 R31.2 R34.1 U2.6 | length 7.5
  Bottom Layer w0.5: R31.2@19.685,97.71 C42.1@21.844,97.71 ; R34.1@21.844,95.076 C42.1@21.844,97.71 ; U2.6@24.003,96.647 24.003,96.774 23.114,97.663 21.891,97.663 C42.1@21.844,97.71
NetC53_1: 
NetC54_1: 
NetC57_1: 
NetC63_1: 
NetC70_1: 
NetC71_1: 
NetC72_1: 
NetC75_1: 
NetCR1_3: CR1.3 MOC1.4 R2.1 | length 46.6
  Top Layer w0.7: R2.1@64.389,56.916 64.389,51.435 62.357,49.403 62.357,45.593 63.246,44.704 81.28,44.704 84.709,41.275 CR1.3@90.551,35.75
  Bottom Layer w0.7: R2.1@64.389,56.916 MOC1.4@64.389,59.182
NetD1_1: D1.1 R24.2 | length 2.8
  Bottom Layer w0.5: R24.2@77.806,133.477 77.851,133.432 D1.1@77.851,130.683
NetD2_1: D2.1 R28.2 | length 2.7
  Bottom Layer w0.5: D2.1@62.992,114.935 R28.2@65.741,114.935
NetD3_1: D3.1 R26.2 | length 2.8
  Bottom Layer w0.5: R26.2@77.806,117.729 77.851,117.684 D3.1@77.851,114.935
NetD4_1: D4.1 R32.2 | length 3
  Bottom Layer w0.5: D4.1@62.992,99.187 R32.2@65.995,99.187
NetD5_1: D5.1 R30.2 | length 2.8
  Bottom Layer w0.5: D5.1@77.892,99.228 R30.2@77.892,101.94
  Bottom Layer w0.7: D5.1@77.851,99.187 D5.1@77.892,99.228 ; R30.2@77.892,101.94 R30.2@77.933,101.981
NetD6_1: D6.1 R35.2 | length 2.8
  Bottom Layer w0.5: R35.2@77.806,87.122 77.851,87.077 D6.1@77.851,84.328
NetD7_1: D7.1 R36.1 | length 2.7
  Bottom Layer w0.5: D7.1@62.992,83.439 R36.1@65.741,83.439
NetD8_1: D8.1 R39.2 | length 4.7
  Bottom Layer w0.5: D8.1@77.851,67.691 79.502,67.691 80.092,67.101 R39.2@82.296,67.101
NetD11_2: D11.2 IC10.2 L1.1 | length 15.3
  Bottom Layer w0.7: D11.2@36.648,69.723 36.576,69.651 L1.1@36.576,64.262 36.576,60.452 39.067,57.961 IC10.2@39.067,55.476
NetD12_1: D12.1 Q2.3 | length 3.1
  Bottom Layer w1: 13.716,51.063 D12.1@13.716,54.174
NetD17_2: D17.2 D18.2 R41.1 | length 59.7
  Top Layer w0.7: v1(60.071,46.228) 60.071,43.942 60.706,43.307 80.391,43.307 82.677,41.021 82.677,26.681 83.087,26.271 84.473,26.271 v1(84.582,26.162)
  Bottom Layer w0.7: R41.1@57.449,46.228 v1(60.071,46.228) ; v1(84.582,26.162) 92.329,26.162 93.091,25.4 D18.2@93.091,23.241 96.592,23.241 D17.2@96.647,23.296
NetD19_1: D19.1 D20.1 R43.1 | length 52.9
  Top Layer w0.7: v1(57.023,43.434) 58.547,41.91 79.756,41.91 81.153,40.513 81.153,23.76 81.563,23.35 82.441,23.35 v1(82.55,23.241)
  Bottom Layer w0.7: R43.1@54.782,43.434 v1(57.023,43.434) ; v1(82.55,23.241) D20.1@85.979,23.241
  Bottom Layer w1: D20.1@85.979,23.241 D19.1@89.535,23.241
NetD21_1: 
NetD21_2: 
NetD23_1: 
NetDZ1_1: DZ1.1 Q2.1 R42.1 R44.1 | length 9.6
  Bottom Layer w0.5: R44.1@13.542,40.767 13.542,45.516 14.762,46.736 14.812,46.736 14.666,46.882 Q2.1@14.666,49.775
NetIC1_1: IC1.1 R13.1 | length 2.4
  Bottom Layer w0.5: IC1.1@67.183,147.595 R13.1@67.183,150.034
NetIC2_1: IC2.1 R14.1 | length 2.4
  Bottom Layer w0.5: IC2.1@61.468,147.595 R14.1@61.468,150.034
NetIC3_1: IC3.1 R15.1 | length 2.6
  Bottom Layer w0.5: R15.1@55.753,150.034 55.769,150.018 55.769,147.484 IC3.1@55.786,147.468
NetIC4_1: IC4.1 R16.1 | length 2.6
  Bottom Layer w0.5: R16.1@50.165,150.034 50.185,150.014 50.185,147.488 IC4.1@50.206,147.468
NetIC5_1: IC5.1 R17.1 | length 2.6
  Bottom Layer w0.5: IC5.1@44.577,147.468 R17.1@44.577,150.034
NetIC6_1: IC6.1 R18.1 | length 5.6
  Bottom Layer w0.5: IC6.1@38.989,147.468 38.989,149.606 39.417,150.034 R18.1@42.291,150.034
NetIC7_1: IC7.1 R23.1 | length 5.7
  Bottom Layer w0.5: R23.1@35.814,132.127 35.814,130.561 38.084,128.291 IC7.1@38.989,128.291
NetIC7_4: IC7.4 R27.1 | length 24.1
  Top Layer w0.5: v1(21.971,118.364) 23.114,119.507 v1(38.056,119.507)
  Bottom Layer w0.5: R27.1@16.209,116.713 20.32,116.713 v1(21.971,118.364) ; v1(38.056,119.507) 38.587,119.507 IC7.4@38.989,119.105
NetIC8_1: IC8.1 R22.1 | length 9.7
  Bottom Layer w0.5: R22.1@38.354,132.127 43.895,132.127 44.577,131.445 IC8.1@44.577,128.291
NetIC9_1: IC9.1 R41.2 | length 3.1
  Bottom Layer w0.7: IC9.1@53.467,49.255 53.508,49.214 53.508,46.269 R41.2@53.549,46.228
NetIC9_2: IC9.2 R43.2 | length 5.8
  Bottom Layer w0.7: R43.2@50.882,43.434 50.905,43.456 50.905,49.233 IC9.2@50.927,49.255
NetIC11_9: 
NetIC11_14: 
NetL2_1: 
NetL2_2: 
NetLD1_1: 
NetLD2_1: 
NetMOC1_1: MOC1.1 R38.1 | length 2.5
  Bottom Layer w0.254: MOC1.1@69.469,66.802 R38.1@69.469,69.262